# Altium PCB RC_Wheelchair.PcbDoc (part 2 of 2)
Units mil, origin at the board's own origin, x right, y up, seen from the top; angles counter-clockwise.
Board outline 6000 x 4000 mil, 2 copper layers (Top Layer, Bottom Layer); 99 components, 129 nets, 398 pads, 0 vias.
Unrouted connection lines stored in the file: 229.
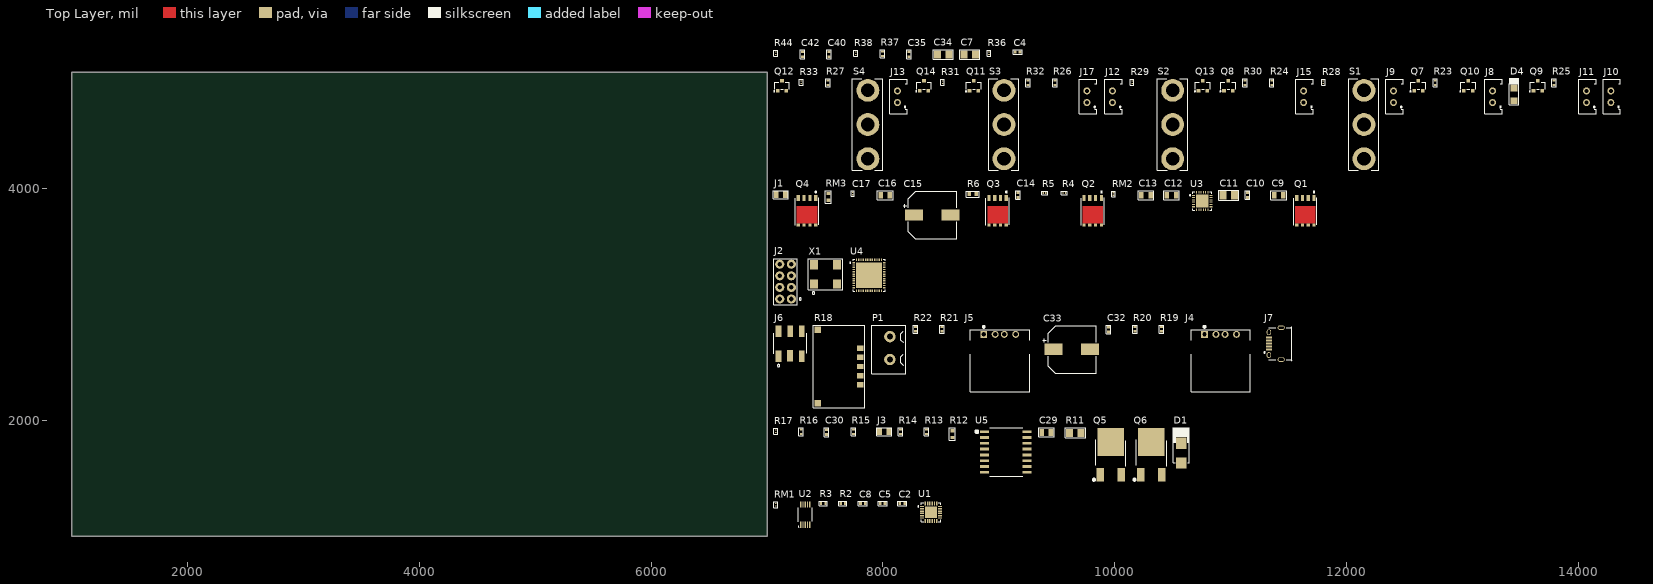
[diagram p0: Top Layer view]

## Part data (continued)
R11: library part ERJ-8BWJR082V, "RES 0.082 OHM 5% 1W 1206", Case/Package=1206, Case Code (Metric)=3216, Manufacturer=Panasonic, Max Operating Temperature=155°C, Max Power Dissipation=1W, Min Operating Temperature=-55°C, Package Quantity=1, Resistance=82mR, Supplier Part Number 1=P.082AVDKR-ND, Temperature Coefficient=100ppm/°C, Tolerance=5%, Case Code (Imperial)=1206, ComponentLink1Description=https://industrial.panasonic.com/cdbs/www-data/pdf/RDN0000/AOA0000C313.pdf?src-supplier=Digi-Key, ComponentLink1URL=https://industrial.panasonic.com/cdbs/www-data/pdf/RDN0000/AOA0000C313.pdf?src-supplier=Digi-Key, ComponentLink2Description=http://industrial.panasonic.com/www-data/pdf/AOA0000/AOA0000CE3.pdf?src-supplier=Avnet+Europe, ComponentLink2URL=http://industrial.panasonic.com/www-data/pdf/AOA0000/AOA0000CE3.pdf?src-supplier=Avnet+Europe, ComponentLink3Description=https://www.alliedelec.com/m/d/343577d27580f3e2a275b8e77c10f6b8.pdf?src-supplier=Allied+Electronics, ComponentLink3URL=https://www.alliedelec.com/m/d/343577d27580f3e2a275b8e77c10f6b8.pdf?src-supplier=Allied+Electronics, ComponentLink4Description=http://www.mouser.com/ds/2/315/AOA0000CE3-72189.pdf?src-supplier=Mouser, ComponentLink4URL=http://www.mouser.com/ds/2/315/AOA0000CE3-72189.pdf?src-supplier=Mouser, ComponentLink5Description=http://uk.rs-online.com/webdocs/13b8/0900766b813b869e.pdf?src-supplier=RSComponents, ComponentLink5URL=http://uk.rs-online.com/webdocs/13b8/0900766b813b869e.pdf?src-supplier=RSComponents, Composition="Thick Film", Contact Plating=Tin, Depth=1.6mm, Features="Automotive AEC-Q200", Height=0.65mm, Length=3.2mm, Manufacturer Part Number=ERJ-8BWJR082V, Mount="Surface Mount", Number of Terminations=2, Packaging="Tape and Reel", Power Rating=1W, Pricing 1="1=0.67, 10=0.476, 100=0.2477, 1000=0.13336, 2500=0.12955 (USD)", Radiation Hardening=No, Stock 1=5726, Supplier 1=Digi-Key, Termination=SMD/SMT, Width=0.063inch
R12: library part RC0603FR-07162KL, "RES SMD 162K OHM 1% 1/10W 0603", Case/Package=0603, Case Code (Metric)=1608, Manufacturer=Yageo, Max Operating Temperature=155°C, Min Operating Temperature=-55°C, Power Rating=100mW, Resistance=162kR, Supplier Part Number 1=311-162KHRDKR-ND, Temperature Coefficient=100ppm/°C, Tolerance=1%, Voltage Rating=75V, Voltage Rating (DC)=50V, Case Code (Imperial)=0603, ComponentLink1Description=http://documents.rs-components.com/techlib://itc_doclist_GB.htm?stockno=5049814&src-supplier=RSComponents, ComponentLink1URL=http://documents.rs-components.com/techlib://itc_doclist_GB.htm?stockno=5049814&src-supplier=RSComponents, Composition="Thick Film", Depth=0.8mm, Height=0.45mm, Lead Free="Lead Free", Length=1.6mm, Manufacturer Part Number=RC0603FR-07162KL, Military Standard=Not, Mount="Surface Mount", Packaging="Tape and Reel", Pricing 1="1=0.1, 10=0.023, 100=0.0094, 1000=0.00421, 2500=0.00366 (USD)", Stock 1=119963, Supplier 1=Digi-Key, Termination=SMD/SMT, Weight=7.1E-05oz, Width=0.8mm
R13: library part RC0402FR-0716K9L, "RES SMD 16.9K OHM 1% 1/16W 0402", Case/Package=0402, Case Code (Metric)=1005, Manufacturer=Yageo, Max Operating Temperature=155°C, Max Power Dissipation=63mW, Min Operating Temperature=-55°C, Package Quantity=10000, Power Rating=62.5mW, Resistance=16.9kR, Supplier Part Number 1=YAG3003DKR-ND, Temperature Coefficient=100ppm/°C, Tolerance=1%, Voltage Rating=50V, Case Code (Imperial)=0402, ComponentLink1Description=http://www.yageo.com/documents/recent/PYu-RC0402_51_RoHS_L_6.pdf?src-supplier=Avnet+Europe, ComponentLink1URL=http://www.yageo.com/documents/recent/PYu-RC0402_51_RoHS_L_6.pdf?src-supplier=Avnet+Europe, ComponentLink2Description=http://www.mouser.com/ds/2/447/PYu-RC0402_51_RoHS_L_6_r-8721.pdf?src-supplier=Mouser, ComponentLink2URL=http://www.mouser.com/ds/2/447/PYu-RC0402_51_RoHS_L_6_r-8721.pdf?src-supplier=Mouser, ComponentLink3Description=http://www.yageo.com/documents/recent/PYu-RC0402_51_RoHS_L_6_r.pdf?src-supplier=Future+Electronics, ComponentLink3URL=http://www.yageo.com/documents/recent/PYu-RC0402_51_RoHS_L_6_r.pdf?src-supplier=Future+Electronics, Composition="Thick Film", Contact Plating=Tin,Matte, Depth=0.5mm, Features="Moisture Resistant", Height=0.016inch, Lead Free="Lead Free", Length=1mm, Manufacturer Part Number=RC0402FR-0716K9L, Military Standard=Not, Number of Terminations=2, Packaging="Tape and Reel", Pricing 1="1=0.1, 10=0.016, 100=0.0064, 1000=0.00289, 2500=0.00251, 5000=0.00207 (USD)", Stock 1=85975, Supplier 1=Digi-Key, Termination=SMD/SMT, Voltage Rating (DC)=50V, Width=0.02inch
R14: library part ERJ-2RKF4642X, "RES SMD 46.4K OHM 1% 1/10W 0402", Case/Package=0402, Case Code (Metric)=1005, Manufacturer=Panasonic, Max Operating Temperature=155°C, Max Power Dissipation=100mW, Min Operating Temperature=-55°C, Package Quantity=1, Resistance=46.4kR, Supplier Part Number 1=P46.4KLDKR-ND, Temperature Coefficient=100ppm/°C, Tolerance=1%, Voltage Rating=50V, Case Code (Imperial)=0402, ComponentLink1Description=http://www.industrial.panasonic.com/www-data/pdf/AOA0000/AOA0000CE2.pdf?src-supplier=Element14, ComponentLink1URL=http://www.industrial.panasonic.com/www-data/pdf/AOA0000/AOA0000CE2.pdf?src-supplier=Element14, ComponentLink2Description=http://industrial.panasonic.com/www-data/pdf/AOA0000/AOA0000CE2.pdf?src-supplier=Avnet, ComponentLink2URL=http://industrial.panasonic.com/www-data/pdf/AOA0000/AOA0000CE2.pdf?src-supplier=Avnet, ComponentLink3Description=http://www.farnell.com/datasheets/1678782.pdf?src-supplier=Farnell, ComponentLink3URL=http://www.farnell.com/datasheets/1678782.pdf?src-supplier=Farnell, ComponentLink4Description=http://www.farnell.com/datasheets/1678782.pdf?src-supplier=Element14, ComponentLink4URL=http://www.farnell.com/datasheets/1678782.pdf?src-supplier=Element14, ComponentLink5Description=http://www.farnell.com/datasheets/1911175.pdf?src-supplier=Farnell, ComponentLink5URL=http://www.farnell.com/datasheets/1911175.pdf?src-supplier=Farnell, ComponentLink6Description=https://www.alliedelec.com/m/d/623f45ff1957d936ff56d46fd1c28cac.pdf?src-supplier=Allied+Electronics, ComponentLink6URL=https://www.alliedelec.com/m/d/623f45ff1957d936ff56d46fd1c28cac.pdf?src-supplier=Allied+Electronics, Composition="Thick Film", Contact Plating=Tin, Depth=0.5mm, Features="Automotive AEC-Q200", Height=0.35mm, Lead Free="Lead Free", Length=1mm, Manufacturer Part Number=ERJ-2RKF4642X, Military Standard=Not, Mount="Surface Mount", Number of Terminations=2, Packaging="Tape and Reel", Power Rating=100mW, Pricing 1="1=0.1, 10=0.024, 100=0.0097, 1000=0.00437, 2500=0.0038, 5000=0.00314 (USD)", Radiation Hardening=No, REACH SVHC=Yes, Stock 1=59686, Supplier 1=Digi-Key, Termination=SMD/SMT, Voltage Rating (DC)=50V, Width=0.02inch
R15: library part ERJ-2RKF4753X, "RES SMD 475K OHM 1% 1/10W 0402", Case/Package=0402, Case Code (Metric)=1005, Manufacturer=Panasonic, Max Operating Temperature=155°C, Max Power Dissipation=100mW, Min Operating Temperature=-55°C, Package Quantity=10000, Resistance=475kR, Supplier Part Number 1=P475KLCT-ND, Temperature Coefficient=100ppm/°C, Tolerance=1%, Voltage Rating=50V, Case Code (Imperial)=0402, ComponentLink1Description=http://www.industrial.panasonic.com/www-data/pdf/AOA0000/AOA0000CE2.pdf?src-supplier=Element14, ComponentLink1URL=http://www.industrial.panasonic.com/www-data/pdf/AOA0000/AOA0000CE2.pdf?src-supplier=Element14, ComponentLink2Description=http://www.farnell.com/datasheets/1678782.pdf?src-supplier=Element14, ComponentLink2URL=http://www.farnell.com/datasheets/1678782.pdf?src-supplier=Element14, ComponentLink3Description=http://industrial.panasonic.com/www-data/pdf/AOA0000/AOA0000CE2.pdf?src-supplier=Avnet, ComponentLink3URL=http://industrial.panasonic.com/www-data/pdf/AOA0000/AOA0000CE2.pdf?src-supplier=Avnet, ComponentLink4Description=http://www.farnell.com/datasheets/1678782.pdf?src-supplier=Farnell, ComponentLink4URL=http://www.farnell.com/datasheets/1678782.pdf?src-supplier=Farnell, ComponentLink5Description=http://industrial.panasonic.com/cdbs/www-data/pdf/RDA0000/AOA0000C304.pdf?src-supplier=Farnell, ComponentLink5URL=http://industrial.panasonic.com/cdbs/www-data/pdf/RDA0000/AOA0000C304.pdf?src-supplier=Farnell, ComponentLink6Description=http://www.alliedelec.com/m/d/623f45ff1957d936ff56d46fd1c28cac.pdf?src-supplier=Allied+Electronics, ComponentLink6URL=http://www.alliedelec.com/m/d/623f45ff1957d936ff56d46fd1c28cac.pdf?src-supplier=Allied+Electronics, Composition="Thick Film", Contact Plating=Tin, Depth=0.5mm, Height=0.35mm, Lead Free="Lead Free", Length=1mm, Manufacturer Part Number=ERJ-2RKF4753X, Military Standard=Not, Mount="Surface Mount", Number of Terminations=2, Packaging="Tape and Reel", Power Rating=100mW, Pricing 1="1=0.1, 10=0.041, 100=0.0166, 1000=0.00747, 2500=0.00649, 5000=0.00536 (USD)", REACH SVHC=Yes, Stock 1=83446, Supplier 1=Digi-Key, Termination=SMD/SMT, Voltage Rating (DC)=50V, Width=0.02inch
R16: library part RC0402FR-07442RL, "RES SMD 442 OHM 1% 1/16W 0402", Case/Package=0402, Case Code (Metric)=1005, Manufacturer=Yageo, Max Operating Temperature=155°C, Max Power Dissipation=63mW, Min Operating Temperature=-55°C, Power Rating=62.5mW, Supplier Part Number 1=YAG3162DKR-ND, Temperature Coefficient=100ppm/°C, Tolerance=1%, Voltage Rating=50V, Case Code (Imperial)=0402, ComponentLink1Description=http://www.yageo.com/documents/recent/PYu-RC0402_51_RoHS_L_6_r.pdf?src-supplier=Future+Electronics, ComponentLink1URL=http://www.yageo.com/documents/recent/PYu-RC0402_51_RoHS_L_6_r.pdf?src-supplier=Future+Electronics, ComponentLink2Description=http://www.yageo.com/documents/recent/PYu-RC0402_51_RoHS_L_6.pdf?src-supplier=Avnet, ComponentLink2URL=http://www.yageo.com/documents/recent/PYu-RC0402_51_RoHS_L_6.pdf?src-supplier=Avnet, ComponentLink3Description=http://www.yageo.com/documents/recent/PYu-RC0402_51_RoHS_L_6.pdf?src-supplier=Avnet+Europe, ComponentLink3URL=http://www.yageo.com/documents/recent/PYu-RC0402_51_RoHS_L_6.pdf?src-supplier=Avnet+Europe, Composition="Thick Film", Contact Plating=Tin,Matte, Depth=0.5mm, Features="Moisture Resistant", Height=0.016inch, Lead Free="Lead Free", Length=1mm, Manufacturer Part Number=RC0402FR-07442RL, Military Standard=Not, Number of Terminations=2, Packaging="Tape and Reel", Pricing 1="1=0.1, 10=0.016, 100=0.0064, 1000=0.00289, 2500=0.00251, 5000=0.00207 (USD)", Resistance=442R, Stock 1=549714, Supplier 1=Digi-Key, Termination=SMD/SMT, Voltage Rating (DC)=50V, Width=0.5mm
R18: library part RK14J11R000J, "10K ±30% SMD Potentiometers & Variable Resistors RoHS", Manufacturer="Alps Electric", Max Operating Temperature=70°C, Min Operating Temperature=-25°C, Power Rating=30mW, Resistance=10kR, Supplier Part Number 1=688-RK14J11R000J, Tolerance=30%, ComponentLink1Description=http://www.alps.com/prod/info/E/HTML/Potentiometer/RotaryPotentiometers/RKJ1/RKJ1_list.html?src-supplier=Avnet+Europe, ComponentLink1URL=http://www.alps.com/prod/info/E/HTML/Potentiometer/RotaryPotentiometers/RKJ1/RKJ1_list.html?src-supplier=Avnet+Europe, ComponentLink2Description=http://www.alps.com/products/WebObjects/catalog.woa/E/HTML/Potentiometer/RotaryPotentiometers/RKJ1/RKJ1_list.html?src-supplier=Avnet, ComponentLink2URL=http://www.alps.com/products/WebObjects/catalog.woa/E/HTML/Potentiometer/RotaryPotentiometers/RKJ1/RKJ1_list.html?src-supplier=Avnet, ComponentLink3Description=http://www.alps.com/WebObjects/catalog.woa/E/HTML/Potentiometer/RotaryPotentiometers/RKJ1/RK14J11R000J.html?src-supplier=Mouser, ComponentLink3URL=http://www.alps.com/WebObjects/catalog.woa/E/HTML/Potentiometer/RotaryPotentiometers/RKJ1/RK14J11R000J.html?src-supplier=Mouser, Composition=Potentiometer, Manufacturer Part Number=RK14J11R000J, Mount="Surface Mount", Number of Gangs=1, Number of Turns=1, Packaging=Bulk, Pricing 1="1=1.09, 25=0.964, 50=0.902, 100=0.872, 500=0.81, 1000=0.789 (USD)", Radiation Hardening=No, Stock 1=245, Supplier 1=Mouser, Taper=Linear, Termination=SMD/SMT, Type=Potentiometer
R19 R20 R21 R22: library part RC0402JR-070RL, "RES SMD 0 OHM JUMPER 1/16W 0402", Case/Package=0402, Case Code (Metric)=1005, Manufacturer=Yageo, Manufacturer Part Number=RC0402FR-070RL, Max Operating Temperature=155°C, Min Operating Temperature=-55°C, Power Rating=62.5mW, Resistance=0mR, Supplier Part Number 1=311-0.0LRCT-ND, Temperature Coefficient=200ppm/°C, Tolerance=1%, Voltage Rating=50V, Case Code (Imperial)=0402, ComponentLink1Description=http://www.yageo.com/documents/recent/PYu-RC0402_51_RoHS_L_6.pdf?src-supplier=Avnet, ComponentLink1URL=http://www.yageo.com/documents/recent/PYu-RC0402_51_RoHS_L_6.pdf?src-supplier=Avnet, ComponentLink2Description=http://www.yageo.com/documents/recent/PYu-RC0402_51_RoHS_L_6_r.pdf?src-supplier=Future+Electronics, ComponentLink2URL=http://www.yageo.com/documents/recent/PYu-RC0402_51_RoHS_L_6_r.pdf?src-supplier=Future+Electronics, ComponentLink3Description=http://www.yageo.com/documents/recent/PYu-RC0402_51_RoHS_L_6.pdf?src-supplier=Avnet+Europe, ComponentLink3URL=http://www.yageo.com/documents/recent/PYu-RC0402_51_RoHS_L_6.pdf?src-supplier=Avnet+Europe, Composition="Thick Film", Contact Plating=Tin,Matte, Height=0.35mm, Lead Free="Lead Free", Length=1mm, Mount="Surface Mount", Packaging="Tape and Reel", Pricing 1="1=0.1, 10=0.013, 25=0.0092, 50=0.0072, 100=0.0053, 250=0.004, 500=0.0032, 1000=0.00236, 5000=0.00169 (USD)", Radiation Hardening=No, Stock 1=3681314, Supplier 1=Digi-Key, Termination=SMD/SMT, Width=0.5mm
R23 R24 R26 R27: library part RC0402FR-0768RL, "RES SMD 68 OHM 1% 1/16W 0402", Case/Package=0402, Case Code (Metric)=1005, Manufacturer=Yageo, Max Operating Temperature=155°C, Max Power Dissipation=63mW, Min Operating Temperature=-55°C, Package Quantity=1, Supplier Part Number 1=311-68.0LRCT-ND, Temperature Coefficient=100ppm/°C, Tolerance=1%, Voltage Rating=50V, Case Code (Imperial)=0402, ComponentLink1Description=http://www.yageo.com/documents/recent/PYu-RC_Group_51_RoHS_L_10.pdf?src-supplier=Digi-Key, ComponentLink1URL=http://www.yageo.com/documents/recent/PYu-RC_Group_51_RoHS_L_10.pdf?src-supplier=Digi-Key, ComponentLink2Description=http://www.yageo.com.tw/exep/pages/download/literatures/PYu-R_INT-thick_7.pdf?src-supplier=Digi-Key, ComponentLink2URL=http://www.yageo.com.tw/exep/pages/download/literatures/PYu-R_INT-thick_7.pdf?src-supplier=Digi-Key, ComponentLink3Description=http://www.mouser.com/ds/2/447/PYu-RC0402_51_RoHS_L_6_r-8721.pdf?src-supplier=Mouser, ComponentLink3URL=http://www.mouser.com/ds/2/447/PYu-RC0402_51_RoHS_L_6_r-8721.pdf?src-supplier=Mouser, ComponentLink4Description=http://www.farnell.com/datasheets/1018594.pdf?src-supplier=Element14, ComponentLink4URL=http://www.farnell.com/datasheets/1018594.pdf?src-supplier=Element14, ComponentLink5Description=https://www.verical.com/server-webapp/html/getDatasheet?partID=325392&src-supplier=Verical, ComponentLink5URL=https://www.verical.com/server-webapp/html/getDatasheet?partID=325392&src-supplier=Verical, Composition="Thick Film", Depth=0.5mm, Features="Moisture Resistant", Height=0.016inch, Lead Free="Lead Free", Length=1mm, Manufacturer Part Number=RC0402FR-0768RL, Military Standard=Not, Number of Terminations=2, Packaging="Tape and Reel", Power Rating=63mW, Pricing 1="1=0.1, 10=0.015, 100=0.0062, 1000=0.00278, 2500=0.00242, 5000=0.002 (USD)", REACH SVHC="No SVHC", Resistance=68R, Stock 1=456960, Supplier 1=Digi-Key, Termination=SMD/SMT, Width=0.02inch
R25: library part RC0402FR-0748R7L, "RES SMD 48.7 OHM 1% 1/16W 0402"
R30 R32: library part ERJ-2RKF2400X, "RES SMD 240 OHM 1% 1/10W 0402", Case/Package=0402, Case Code (Metric)=1005, Manufacturer=Panasonic, Max Operating Temperature=155°C, Max Power Dissipation=100mW, Min Operating Temperature=-55°C, Package Quantity=1, Supplier Part Number 1=P240LCT-ND, Temperature Coefficient=100ppm/°C, Tolerance=1%, Voltage Rating=50V, Case Code (Imperial)=0402, ComponentLink1Description=http://www.farnell.com/datasheets/426256.pdf?src-supplier=Element14, ComponentLink1URL=http://www.farnell.com/datasheets/426256.pdf?src-supplier=Element14, ComponentLink2Description=http://industrial.panasonic.com/www-data/pdf/AOA0000/AOA0000CE2.pdf?src-supplier=Avnet, ComponentLink2URL=http://industrial.panasonic.com/www-data/pdf/AOA0000/AOA0000CE2.pdf?src-supplier=Avnet, ComponentLink3Description=http://www.mouser.com/ds/2/315/AOA0000CE2-37512.pdf?src-supplier=Mouser, ComponentLink3URL=http://www.mouser.com/ds/2/315/AOA0000CE2-37512.pdf?src-supplier=Mouser, ComponentLink4Description=http://www.farnell.com/datasheets/1678782.pdf?src-supplier=Element14, ComponentLink4URL=http://www.farnell.com/datasheets/1678782.pdf?src-supplier=Element14, ComponentLink5Description=https://www.alliedelec.com/m/d/623f45ff1957d936ff56d46fd1c28cac.pdf?src-supplier=Allied+Electronics, ComponentLink5URL=https://www.alliedelec.com/m/d/623f45ff1957d936ff56d46fd1c28cac.pdf?src-supplier=Allied+Electronics, ComponentLink6Description=http://industrial.panasonic.com/cdbs/www-data/pdf/RDA0000/AOA0000C304.pdf?src-supplier=Farnell, ComponentLink6URL=http://industrial.panasonic.com/cdbs/www-data/pdf/RDA0000/AOA0000C304.pdf?src-supplier=Farnell, ComponentLink7Description=http://www.farnell.com/datasheets/1911175.pdf?src-supplier=Farnell, ComponentLink7URL=http://www.farnell.com/datasheets/1911175.pdf?src-supplier=Farnell, Composition="Thick Film", Contact Plating=Tin, Depth=0.5mm, Features="Automotive AEC-Q200", Height=0.35mm, Lead Free="Lead Free", Length=1mm, Manufacturer Part Number=ERJ-2RKF2400X, Military Standard=Not, Mount="Surface Mount", Number of Terminations=2, Packaging="Tape and Reel", Power Rating=100mW, Pricing 1="1=0.1, 10=0.036, 100=0.0145, 1000=0.00649, 2500=0.00564, 5000=0.00466 (USD)", Radiation Hardening=No, REACH SVHC="No SVHC", Resistance=240R, Stock 1=969166, Supplier 1=Digi-Key, Termination=SMD/SMT, Voltage Rating (DC)=50V, Width=0.02inch, Working Voltage=50V
S1 S2 S3 S4: "SWITCH SNAP ACTION SPDT 5A 125V", Case/Package=125, Color=Black, Contact Current Rating=10A, Current Rating=1A, Flammability Rating="UL94 V-0", Manufacturer=Cherry, Max Current Rating=6A, Max Operating Temperature=120°C, Max Voltage Rating (AC)=250V, Max Voltage Rating (DC)=48V, Min Operating Temperature=-40°C, Operating Force=1.96N, Operating Position=0.33inch, Package Quantity=1200, Ratings="IP67,Waterproof,Dust Tight", Supplier Part Number 1=CH290-ND, Voltage Rating (AC)=125V, Actuator Material=Polybutylene, Approvals=UL,VDE, ComponentLink1Description=https://www.verical.com/server-webapp/html/getDatasheet?partID=244158&src-supplier=Verical, ComponentLink1URL=https://www.verical.com/server-webapp/html/getDatasheet?partID=244158&src-supplier=Verical, ComponentLink2Description=http://www.rapidonline.com/pdf/520203.pdf?src-supplier=Rapid+Electronics, ComponentLink2URL=http://www.rapidonline.com/pdf/520203.pdf?src-supplier=Rapid+Electronics, ComponentLink3Description=http://cherryswitches.com/wp-content/blogs.dir/7/2012/07/subminiature_switch_DC_EN1.pdf?src-supplier=Digi-Key, ComponentLink3URL=http://cherryswitches.com/wp-content/blogs.dir/7/2012/07/subminiature_switch_DC_EN1.pdf?src-supplier=Digi-Key, ComponentLink4Description=http://www.produktinfo.conrad.com/datenblaetter/700000-724999/704435-da-01-ml-SUBMINIATURSCHAL_DC1C_A1AA_6A_250V_de_en.pdf?src-supplier=Conrad, ComponentLink4URL=http://www.produktinfo.conrad.com/datenblaetter/700000-724999/704435-da-01-ml-SUBMINIATURSCHAL_DC1C_A1AA_6A_250V_de_en.pdf?src-supplier=Conrad, Contact Material=Copper,Silver, Contact Plating=Silver, Depth=6.45mm, Differential Travel=0.004inch, Electrical Life=6000Cycles, Lead Free="Lead Free", Length=20mm, Manufacturer Part Number=DC1C-A1AA, Material=Polyethylene, Mechanical Life=1000000Cycles, Mount="Chassis Mount,Surface Mount,Brackets", Number of Poles=1, Overtravel=0.025inch, Packaging=Bulk, Pretravel=0.04inch, Pricing 1="1=4.87, 10=4.298, 25=4.0112, 50=3.82, 100=3.247, 250=2.96052, 500=2.7695, 1000=2.674, 5000=2.53075 (USD)", REACH SVHC="No SVHC", Stock 1=26482, Supplier 1=Digi-Key, Switch Function=On-Mom, Switching Current=6A, Termination=Solder, Throw Configuration=SPDT, Voltage Rating (DC)=48V
U1: "IC USB TO UART BRIDGE QFN24", Manufacturer="Silicon Labs", Supplier Part Number 1=336-5888-1-ND, Manufacturer Part Number=CP2102N-A02-GQFN24R, Pricing 1="1=1.35, 25=1.3044, 100=1.2543 (USD)", Stock 1=2537, Supplier 1=Digi-Key
U2: "IC USB SWITCH 2X2 10MSOP", Case/Package=MSOP, Drain to Source Resistance=4.5R, Manufacturer="ON Semiconductor / Fairchild", Max Operating Temperature=85°C, Max Supply Voltage=4.3V, Min Operating Temperature=-40°C, Min Supply Voltage=3V, On-State Resistance=10R, Package Quantity=1, Supplier Part Number 1=FSUSB30MUXDKR-ND, Bandwidth=750MHz, ComponentLink1Description=http://www.farnell.com/datasheets/2152074.pdf?src-supplier=Element14, ComponentLink1URL=http://www.farnell.com/datasheets/2152074.pdf?src-supplier=Element14, ComponentLink2Description=http://www.fairchildsemi.com/ds/FS/FSUSB30.pdf?src-supplier=Farnell, ComponentLink2URL=http://www.fairchildsemi.com/ds/FS/FSUSB30.pdf?src-supplier=Farnell, ComponentLink3Description=http://www.fairchildsemi.com/ds/FS/FSUSB30.pdf?src-supplier=Future+Electronics, ComponentLink3URL=http://www.fairchildsemi.com/ds/FS/FSUSB30.pdf?src-supplier=Future+Electronics, ComponentLink4Description=https://www.fairchildsemi.com/datasheets/FS/FSUSB30.pdf?src-supplier=Avnet+Europe, ComponentLink4URL=https://www.fairchildsemi.com/datasheets/FS/FSUSB30.pdf?src-supplier=Avnet+Europe, ComponentLink5Description=https://www.onsemi.com/pub/Collateral/FSUSB30-D.pdf?src-supplier=Digi-Key, ComponentLink5URL=https://www.onsemi.com/pub/Collateral/FSUSB30-D.pdf?src-supplier=Digi-Key, ComponentLink6Description=http://www.mouser.com/ds/2/149/FSUSB30-84238.pdf?src-supplier=Mouser, ComponentLink6URL=http://www.mouser.com/ds/2/149/FSUSB30-84238.pdf?src-supplier=Mouser, ComponentLink7Description=http://www.farnell.com/datasheets/1725753.pdf?src-supplier=Element14, ComponentLink7URL=http://www.farnell.com/datasheets/1725753.pdf?src-supplier=Element14, ComponentLink8Description=https://www.fairchildsemi.com/datasheets/FS/FSUSB30.pdf?src-supplier=Digi-Key, ComponentLink8URL=https://www.fairchildsemi.com/datasheets/FS/FSUSB30.pdf?src-supplier=Digi-Key, ComponentLink9Description=http://www.fairchildsemi.com/ds/FS/FSUSB30.pdf?src-supplier=Element14, ComponentLink9URL=http://www.fairchildsemi.com/ds/FS/FSUSB30.pdf?src-supplier=Element14, ComponentLink10Description=http://datasheet.iiic.cc/fairchild/FSUSB30MUX.pdf?src-supplier=IIIC, ComponentLink10URL=http://datasheet.iiic.cc/fairchild/FSUSB30MUX.pdf?src-supplier=IIIC, Data Rate=480Mbps, Height=1.1mm, Lead Free="Lead Free", Length=3mm, Manufacturer Part Number=FSUSB30MUX, Mount="Surface Mount", Number of Channels=1, Number of Inputs=2, Number of Outputs=4, Number of Pins=10, Number of Ports=2, Packaging="Tape and Reel", Pricing 1="1=0.56, 10=0.495, 25=0.4652, 100=0.3525, 250=0.3, 500=0.285, 1000=0.2175 (USD)", Propagation Delay=0.25ns, Radiation Hardening=No, REACH SVHC="No SVHC", Stock 1=4396, Supplier 1=Digi-Key, Supply Type=Single, Termination=SMD/SMT, Throw Configuration=DPST, Turn-Off Delay Time=4ns, Turn-On Delay Time=7ns, USB Standard="USB 2.0", Weight=0.1125g, Width=3mm
U3: "Motor Driver Power MOSFET Parallel 24-VQFN (4x4)", Case/Package=VQFN, Manufacturer="Texas Instruments", Max Operating Temperature=125°C, Min Operating Temperature=-40°C, Supplier Part Number 1=296-42155-1-ND, ComponentLink1Description=http://www.ti.com/general/docs/lit/getliterature.tsp?genericPartNumber=DRV8701&&fileType=pdf&src-supplier=Avnet, ComponentLink1URL=http://www.ti.com/general/docs/lit/getliterature.tsp?genericPartNumber=DRV8701&&fileType=pdf&src-supplier=Avnet, ComponentLink2Description=http://www.ti.com/lit/ds/symlink/drv8701.pdf?src-supplier=Digi-Key, ComponentLink2URL=http://www.ti.com/lit/ds/symlink/drv8701.pdf?src-supplier=Digi-Key, Interface=Parallel, Lead Free="Lead Free", Manufacturer Part Number=DRV8701ERGET, Mount="Surface Mount", Packaging="Tape and Reel", Pricing 1="1=2.37, 10=2.133, 25=2.0124, 100=1.61 (USD)", Stock 1=10031, Supplier 1=Digi-Key
U4: "IC MCU 32BIT 256KB FLASH 48QFPN", Case/Package=UFQFPN, Frequency=84MHz, Manufacturer=STMicroelectronics, Max Operating Temperature=85°C, Max Power Dissipation=625mW, Max Supply Voltage=3.6V, Min Operating Temperature=-40°C, Min Supply Voltage=1.8V, Operating Supply Voltage=3.3V, Package Quantity=1560, Supplier Part Number 1=497-17426-ND, ComponentLink1Description=http://www.farnell.com/datasheets/1835718.pdf?src-supplier=Element14, ComponentLink1URL=http://www.farnell.com/datasheets/1835718.pdf?src-supplier=Element14, Contact Plating=Tin,Matte, Core Architecture=ARM, Data Bus Width=32b, Height=0.55mm, Interface=I2C,SPI,USB,IrDA,SDIO,UART,USART,LIN,I2S, Lead Free="Lead Free", Length=7.1mm, Manufacturer Part Number=STM32F401CCU6, Max Frequency=84MHz, Memory Size=256KB, Memory Type=FLASH, Number of I2C Channels=3, Number of I/Os=36, Number of Pins=48, Number of Programmable I/O=36, Number of PWM Channels=4, Number of SPI Channels=7, Number of Timers/Counters=8, Number of USB Channels=1, Oscillator Type=Internal, Packaging=Tray, Peripherals="Brown-out Detect/Reset,POR,PWM,WDT,DMA", Pricing 1="1=5.57, 10=4.998, 25=4.7252, 100=4.095, 250=3.885, 500=3.486, 1000=2.94, 2500=2.793, 5000=2.688 (USD)", Radiation Hardening=No, RAM Size=64KB, REACH SVHC="No SVHC", Stock 1=0, Supplier 1=Digi-Key, Watchdog Timer=Yes, Width=7.1mm
U5: "IC BATTERY CHARGER CTRLR 16-SOIC", Case/Package=SOIC, Manufacturer="Texas Instruments", Max Charge Current=2A, Max Operating Temperature=70°C, Max Supply Voltage=40V, Min Input Voltage=5V, Min Operating Temperature=-40°C, Package Quantity=1, Supplier Part Number 1=296-24367-6-ND, ComponentLink1Description=http://www.farnell.com/datasheets/1705294.pdf?src-supplier=Element14, ComponentLink1URL=http://www.farnell.com/datasheets/1705294.pdf?src-supplier=Element14, ComponentLink2Description=http://www.ti.com/lit/ds/symlink/bq24450.pdf?src-supplier=Digi-Key, ComponentLink2URL=http://www.ti.com/lit/ds/symlink/bq24450.pdf?src-supplier=Digi-Key, ComponentLink3Description=https://www.verical.com/server-webapp/html/getDatasheet?partID=516702&src-supplier=Verical, ComponentLink3URL=https://www.verical.com/server-webapp/html/getDatasheet?partID=516702&src-supplier=Verical, ComponentLink4Description=http://www.ti.com/lit/gpn/bq24450?src-supplier=Mouser, ComponentLink4URL=http://www.ti.com/lit/gpn/bq24450?src-supplier=Mouser, ComponentLink5Description=http://www.ti.com/lit/ds/symlink/bq24450.pdf?src-supplier=Avnet+Europe, ComponentLink5URL=http://www.ti.com/lit/ds/symlink/bq24450.pdf?src-supplier=Avnet+Europe, ComponentLink6Description=http://www.ti.com/general/docs/lit/getliterature.tsp?genericPartNumber=BQ24450&&fileType=pdf&src-supplier=Avnet, ComponentLink6URL=http://www.ti.com/general/docs/lit/getliterature.tsp?genericPartNumber=BQ24450&&fileType=pdf&src-supplier=Avnet, Contact Plating=Gold, Lead Free="Lead Free", Manufacturer Part Number=BQ24450DWTR, Min Supply Voltage=5V, Number of Pins=16, Output Current=2A, Packaging="Tape and Reel", Pricing 1="1=11.3, 10=10.206, 25=9.7312, 100=8.0699, 250=7.35784, 500=6.88316, 1000=6.31351 (USD)", Radiation Hardening=No, REACH SVHC="No SVHC", Stock 1=1069, Supplier 1=Digi-Key, Weight=0.016709oz
X1: "24MHz ±100ppm 1.6V ~ 3.6V 3mA SMD-7050_4P SMD Oscillators(XO) RoHS"

## Nets (pads, with @x,y where several pads share a name; then routed paths per layer and width w, separated by ;. In a path a pad name is that pad's centre, name@x,y a point inside that pad or via, vN(x,y) a via of type N, cw(c..) or ccw(c..) an arc to the next point about the centre after c; other vN are vias at no path point)
3V3: R4.2 R5.2 U2.10
5V: C42.1 J2.2 J6.4 J6.5 J11.1 R18.1 R44.2
12V: C33.1 D4.2 J8.1 J9.1 J10.1 J12.1 J13.1 J15.1 J17.1 P1.1
24V: C9.1 C10.1 C11.1 C15.1 C16.1 Q1.5 Q1.6 Q1.7 Q1.8 Q4.5 Q4.6 Q4.7 Q4.8 U3.1
ADJ#: 
AVDD: C12.1 R6.2 U3.7
BOOT0#: U4.44
BOOT#: C4.2
BST#: C40.2
Buzz_: Q10.1 U4.4
CE: R12.2 R13.2 U5.12
Com_1: S1.1 U4.40
Com_2: S2.1 U4.41
Com_3: S3.1 U4.42
Com_4: S4.1 U4.43
COMP: C30.2 U5.14
CPH: C14.1 U3.3
CPL: C14.2 U3.4
DM: U1.4 U2.6
DM1: R19.1 U2.3
DM2: R21.1 U2.7
DM#: U4.32
DP: U1.3 U2.4
DP1: R20.1 U2.2
DP2: R22.1 U2.8
DP#: U4.33
DRVC: Q5.1 U5.16
DRVE: R16.2 U5.15
DVDD: C13.1 U3.8
Echo_1: U4.18
Echo_2: U4.19
Echo_3: U4.20
Echo_4: U4.39
EN: U3.14 U4.10
FB#: R36.2
FREQ#: R38.1
GH1: Q4.4 U3.17
GH2: Q1.4 U3.24
GL1: Q3.4 U3.19
GL2: Q2.4 U3.22
GND: C2.2 C5.2 C7.2 C8.2 C10.2 C11.2 C12.2 C13.2 C15.2 C16.2 C17.2 C29.2 C30.1 C32.2 C33.2 C34.2 C35.2 C42.2 J2.1 J3.2 J4.4 J5.4 J6.1 J6.2 J7.MH1 J7.MH2 J7.MH3 J7.MH4 P1.2 Q7.2 Q8.2 Q9.2 Q10.2 Q11.2 Q12.2 Q13.2 Q14.2 R3.2 R16.1 R18.3 R36.1 RM1.2 RM2.2 RM3.1 S1.2 S2.2 S3.2 S4.2 U1.2 U1.25 U2.5 U3.5 U3.16 U3.20 U3.25 U4.8 U4.23 U4.35 U4.47 U4.49 U5.6
IDRIVE: R6.1 U3.12
IFB: Q5.3 Q6.2_4
ISNS: U5.1 U5.8
ISNSM: R11.1 U5.2 U5.4
LED/LT_1: Q7.1 U4.34
LED/LT_2: Q8.1 U4.37
LED/LT_3: Q11.1 U4.38
LED/LT_4: Q12.1 U4.28
MOUT1: J1.1 Q1.1 Q1.2 Q1.3 Q2.5 Q2.6 Q2.7 Q2.8 U3.18
MOUT2: J1.2 Q3.1 Q3.2 Q3.3 Q4.1 Q4.2 Q4.3 U3.23
NetD4_1: D4.1 J10.2 R25.2
NetJ4_2: J4.2 R19.2
NetJ4_3: J4.3 R20.2
NetJ5_2: J5.2 R21.2
NetJ5_3: J5.3 R22.2
NetJ7_2: J7.2
NetJ7_3: J7.3
NetJ8_2: J8.2 R23.1
NetJ9_2: J9.2 R24.1
NetJ11_2: J11.2 Q10.3
NetJ12_2: J12.2 R26.1
NetJ13_2: J13.2 R27.1
NetJ15_2: J15.2 R30.2
NetJ17_2: J17.2 R32.2
NetLED1_1: 
NetQ5_2_4: Q5.2_4 Q6.1
NetQ7_3: Q7.3 R23.2
NetQ8_3: Q8.3 R24.2
NetQ9_3: Q9.3 R25.1
NetQ11_3: Q11.3 R26.2
NetQ12_3: Q12.3 R27.2
NetQ13_3: Q13.3 R30.1
NetQ14_3: Q14.3 R32.1
NetR9_1: 
NetR10_1: 
NetR28_2: R28.2 S1.3
NetR29_2: R29.2 S2.3
NetR31_2: R31.2 S3.3
NetR33_2: R33.2 S4.3
NetR34_2: 
NetR37_1: R37.1
NetR44_1: R44.1
NetRM1_1: RM1.1 U2.9
NetRM2_1: RM2.1 U3.6
nFAULT: R4.1 U3.9
NGT_1: Q13.1 U4.30
NGT_2: Q14.1 U4.31
NRF_MISO: J2.7 U4.16
NRF_MOSI: J2.6 U4.17
NRF_SCK: J2.5 U4.15
nSLEEP: U3.13 U4.3
P\G\O\O\D\: R14.2 U5.7
PGD#: U4.27
PH: U3.15 U4.11
POT: J6.3 R18.2
PRE-CHG: R17.2 U5.11
PWMIN: J6.6 U4.29
QOUT: D1.1 Q6.3 R17.1
RST#: U4.7
RST_n: U1.9
RXD_: U1.20 U4.12
SNSOUT: R5.1 U3.10
Solenoid_1: Q9.1 U4.14
SP: C17.1 Q2.1 Q2.2 Q2.3 Q3.5 Q3.6 Q3.7 Q3.8 RM3.2 U3.21
STAT1: R15.2 U5.10
SW: C40.1
SW#: C4.1
TEST#: U4.2
Trig_1: U4.45
Trig_2: U4.46
Trig_3: U4.21
Trig_4: U4.25
TXD_: U1.21 U4.13
VBAT: C7.1 C34.1 C35.1 D1.2 J3.1 R12.1 R37.2
VBUS#: R2.1 R3.1 U1.8
VCAP1: U4.22
VCC_3V3: R28.1 R29.1 R31.1 R33.1 U4.1 U4.9 U4.24 U4.36 U4.48
VCP: C9.2 U3.2
VDD: C5.1 C8.1 U1.5 U1.6
VFB: R13.1 R14.1 R15.1 U5.13
VFB#: 
VIN: C29.1 R11.2 U5.3 U5.5
VREG#: R38.2
VSEL: U2.1 U4.26
VUSB: C2.1 C32.1 J4.1 J7.1
VUSB#: J5.1 R2.2 U1.7
X0: U4.5 X1.1
X1: U4.6 X1.2
pads on no net: J2.3 J2.4 J2.8 J4.MH1 J4.MH2 J5.MH1 J5.MH2 J7.4 J7.5 R18.D1 R18.D2 R18.MH1 R18.MH2 R18.MP1 R18.MP2 U1.1 U1.10 U1.11 U1.12 U1.13 U1.14 U1.15 U1.16 U1.17 U1.18 U1.19 U1.22 U1.23 U1.24 U3.11 U5.9 X1.3 X1.4